# EAGLE board Final-Summative (EAGLE 9.7.0)

Size 380.67 x 194.11 mm. Coordinates in mm from the lower left corner, seen from the top.
Outline: 0,0 380.67,0 380.67,194.11 0,194.11 0,0
Copper layers (1*16): Top 0.035mm / dielectric 1.5mm / Bottom 0.035mm
Design rules "default": minimum track width 6mil, minimum drill 0.35mm, track to track 6mil, track to pad 6mil, pad to pad 6mil, via to via 6mil, smd to smd 6mil, copper to edge 40mil, drill to drill 6mil, minimum pad ring 10mil, minimum via ring 8mil, stop-mask expansion 4mil, vias tented up to drill 0mil, thermal gap 10mil

## Footprints (pad centres in the part's own frame; a part is rotated, then mirrored left to right if it is on the bottom)
LEDRD254W60D565H860B_G = drill 0.981 pad 1.581: 1 -1.27,0; 2 1.27,0
LEDRD254W60D565H860B = drill 0.981 pad 1.581: 1 -1.27,0; 2 1.27,0
LEDRD254W60D565H860B_Y = drill 0.981 pad 1.581: 1 -1.27,0; 2 1.27,0
RESAD1016W63L850D250B = drill 0.83 pad 1.43: 1 -5.08,0; 2 5.08,0
GL5528 = drill 0.8 pad 1.4: 1 -1.702,0; 2 1.702,0
HA-06-SM065 = drill 1 pad 1.676: 1 -2.54,-2.54; 2 0,2.54; 3 2.54,-2.54
SG90 = drill 1.016 long: 1 -2.54,0; 2 0,0; 3 2.54,0
78B04ST = drill 0.8: 1 -3.81,-3.81; 2 -1.27,-3.81; 3 1.27,-3.81; 4 3.81,-3.81; 5 3.81,3.81; 6 1.27,3.81; 7 -1.27,3.81; 8 -3.81,3.81
ARDUINO-UNO-R3-SHIELD = drill 1.016 pad 1.88: 3.3V 24.13,-2.54; 5V 24.13,0; A0 24.13,12.7; A1 24.13,15.24; A2 24.13,17.78; A3 24.13,20.32; A4 24.13,22.86; A5 24.13,25.4; AREF -24.13,-13.97; D2 -24.13,20.32; D3 -24.13,17.78; D4 -24.13,15.24; D5 -24.13,12.7; D6 -24.13,10.16; D7 -24.13,7.62; D8 -24.13,3.81; D9 -24.13,1.27; D10 -24.13,-1.27; D11 -24.13,-3.81; D12 -24.13,-6.35; D13 -24.13,-8.89; GND@0 24.13,2.54; GND@1 24.13,5.08; GND@2 -24.13,-11.43; IOREF 24.13,-7.62; NC 24.13,-10.16; RES 24.13,-5.08; RX -24.13,25.4; SCL -24.13,-19.05; SDA -24.13,-16.51; TX -24.13,22.86; VIN 24.13,7.62
JHD-162A = drill 1.016 long: 1 -19.05,0; 2 -16.51,0; 3 -13.97,0; 4 -11.43,0; 5 -8.89,0; 6 -6.35,0; 7 -3.81,0; 8 -1.27,0; 9 1.27,0; 10 3.81,0; 11 6.35,0; 12 8.89,0; 13 11.43,0; 14 13.97,0; 15 16.51,0; 16 19.05,0

## Placement (x,y rotation side)
DGREEN1  GREEN  [LEDRD254W60D565H860B_G]  95.5,140.43 0 top
DGREEN2  GREEN  [LEDRD254W60D565H860B_G]  110.74,140.43 0 top
DGREEN3  GREEN  [LEDRD254W60D565H860B_G]  110.74,122.65 0 top
DGREEN11  GREEN  [LEDRD254W60D565H860B_G]  95.5,122.65 0 top
DRED1  RED  [LEDRD254W60D565H860B]  85.34,140.43 0 top
DRED2  RED  [LEDRD254W60D565H860B]  100.58,140.43 0 top
DRED11  RED  [LEDRD254W60D565H860B]  85.34,122.65 0 top
DRED21  RED  [LEDRD254W60D565H860B]  100.58,122.65 0 top
DYELLOW1  YELLOW  [LEDRD254W60D565H860B_Y]  90.42,140.43 0 top
DYELLOW2  YELLOW  [LEDRD254W60D565H860B_Y]  105.66,140.43 0 top
DYELLOW11  YELLOW  [LEDRD254W60D565H860B_Y]  90.42,122.65 0 top
DYELLOW21  YELLOW  [LEDRD254W60D565H860B_Y]  105.66,122.65 0 top
R1  470  [RESAD1016W63L850D250B]  86.61,112.49 90 top
R2  470  [RESAD1016W63L850D250B]  91.69,112.49 90 top
R3  470  [RESAD1016W63L850D250B]  96.77,112.49 90 top
R4  470  [RESAD1016W63L850D250B]  101.85,112.49 90 top
R5  470  [RESAD1016W63L850D250B]  106.93,112.49 90 top
R6  470  [RESAD1016W63L850D250B]  112.01,112.49 90 top
R7  470  [RESAD1016W63L850D250B]  147.57,109.95 90 top
R8  470  [RESAD1016W63L850D250B]  106.93,148.05 90 top
R9  470  [RESAD1016W63L850D250B]  112.01,148.05 90 top
R10  470  [RESAD1016W63L850D250B]  101.85,148.05 90 top
R11  470  [RESAD1016W63L850D250B]  96.77,148.05 90 top
R12  470  [RESAD1016W63L850D250B]  91.69,148.05 90 top
R13  470  [RESAD1016W63L850D250B]  86.61,148.05 90 top
R14  PHOTOCELL_GL5528  [GL5528]  133.6,125.19 0 top
R15  PHOTOCELL_GL5528  [GL5528]  120.9,142.97 0 top
R16  470  [RESAD1016W63L850D250B]  134.87,112.49 90 top
R17  470  [RESAD1016W63L850D250B]  122.17,127.73 90 top
R18  470  [RESAD1016W63L850D250B]  203.45,148.05 90 top
R19  470  [RESAD1016W63L850D250B]  213.61,148.05 90 top
RPOT1  250k  [HA-06-SM065]  157.73,142.97 0 top
SERVO1  SERVOSG90  [SG90]  374.4,120.6 270 top
SERVO2  SERVOSG90  [SG90]  264.86,120.35 90 top
SW1  SPST-478B04ST  [78B04ST]  207.43,184.58 0 top
U1  ARDUINO-UNO-R3-SHIELD  [ARDUINO-UNO-R3-SHIELD]  29.84,122.66 180 top
U2  LCD-16X2JHD-162A  [JHD-162A]  106.34,36.63 0 top

## Library data of the parts
DGREEN1-DGREEN3 DGREEN11 = Tinkercad; CATEGORY: Opto-Electronic; SUB-CATEGORY: LED; VALUE: LED_GREEN
DRED1 DRED2 DRED11 DRED21 = Tinkercad; CATEGORY: Opto-Electronic; SUB-CATEGORY: LED; VALUE: LED_RED
DYELLOW1 DYELLOW2 DYELLOW11 DYELLOW21 = Tinkercad; CATEGORY: Opto-Electronic; SUB-CATEGORY: LED; VALUE: LED_YELLOW
R1-R19 RPOT1 SERVO1 SERVO2 SW1 U1 U2 = Tinkercad

## Nets
DGREEN1_C: DGREEN1.2 R11.1
DGREEN2_C: DGREEN2.2 R9.1
DGREEN3_C: DGREEN3.2 R6.2
DGREEN11_C: DGREEN11.2 R3.2
DRED1_C: DRED1.2 R13.1
DRED2_C: DRED2.2 R10.1
DRED11_C: DRED11.2 R1.2
DRED21_C: DRED21.2 R4.2
DYELLOW1_C: DYELLOW1.2 R12.1
DYELLOW2_C: DYELLOW2.2 R8.1
DYELLOW11_C: DYELLOW11.2 R2.2
DYELLOW21_C: DYELLOW21.2 R5.2
U1_5V: R7.1 R14.1 R15.1 RPOT1.3 SERVO1.2 SERVO2.2 SW1.7 SW1.8 U1.5V U2.2
U1_A0: R14.2 R16.2 U1.A0
U1_A1: R15.2 R17.2 U1.A1
U1_A2: R18.1 SW1.1 U1.A2
U1_A3: R19.1 SW1.2 U1.A3
U1_A4: SERVO1.3 U1.A4
U1_A5: SERVO2.3 U1.A5
U1_D2: U1.D2 U2.11
U1_D3: U1.D3 U2.12
U1_D4: U1.D4 U2.13
U1_D5: U1.D5 U2.14
U1_D6: U1.D6 U2.6
U1_D7: U1.D7 U2.4
U1_D8: DGREEN2.1 DGREEN3.1 U1.D8
U1_D9: DYELLOW2.1 DYELLOW21.1 U1.D9
U1_D10: DRED2.1 DRED21.1 U1.D10
U1_D11: DGREEN1.1 DGREEN11.1 U1.D11
U1_D12: DYELLOW1.1 DYELLOW11.1 U1.D12
U1_D13: DRED1.1 DRED11.1 U1.D13
U1_GND: R1.1 R2.1 R3.1 R4.1 R5.1 R6.1 R8.2 R9.2 R10.2 R11.2 R12.2 R13.2 R16.1 R17.1 R18.2 R19.2 RPOT1.1 SERVO1.1 SERVO2.1 U1.GND@0 U1.GND@1 U1.GND@2 U2.1 U2.5 U2.16
U2_LED+: R7.2 U2.15
U2_VO: RPOT1.2 U2.3

## Tracks (layer width: path | path; a pad name or v marks a point on that pad's centre or on a via)
DGREEN1_C  (1 unrouted)
DGREEN2_C  (1 unrouted)
DGREEN3_C  (1 unrouted)
DGREEN11_C  (1 unrouted)
DRED1_C  (1 unrouted)
DRED2_C  (1 unrouted)
DRED11_C  (1 unrouted)
DRED21_C  (1 unrouted)
DYELLOW1_C  (1 unrouted)
DYELLOW2_C  (1 unrouted)
DYELLOW11_C  (1 unrouted)
DYELLOW21_C  (1 unrouted)
U1_5V  (9 unrouted)
U1_A0  (2 unrouted)
U1_A1  (2 unrouted)
U1_A2  (2 unrouted)
U1_A3  (2 unrouted)
U1_A4  (1 unrouted)
U1_A5  (1 unrouted)
U1_D2  (1 unrouted)
U1_D3  (1 unrouted)
U1_D4  (1 unrouted)
U1_D5  (1 unrouted)
U1_D6  (1 unrouted)
U1_D7  (1 unrouted)
U1_D8  (2 unrouted)
U1_D9  (2 unrouted)
U1_D10  (2 unrouted)
U1_D11  (2 unrouted)
U1_D12  (2 unrouted)
U1_D13  (2 unrouted)
U1_GND  (24 unrouted)
U2_LED+  (1 unrouted)
U2_VO  (1 unrouted)